# Altium PCB DIOT_Sampler_Adapter.PCBDOC (part 1 of 3)
Units mm, origin at the board's own origin, x right, y up, seen from the top; angles counter-clockwise.
Board outline 37 x 98.9 mm, 4 copper layers (L1, P2, L3, L4), stack 1.6 mm thick; 18 components, 14 nets, 57 pads, 0 vias.
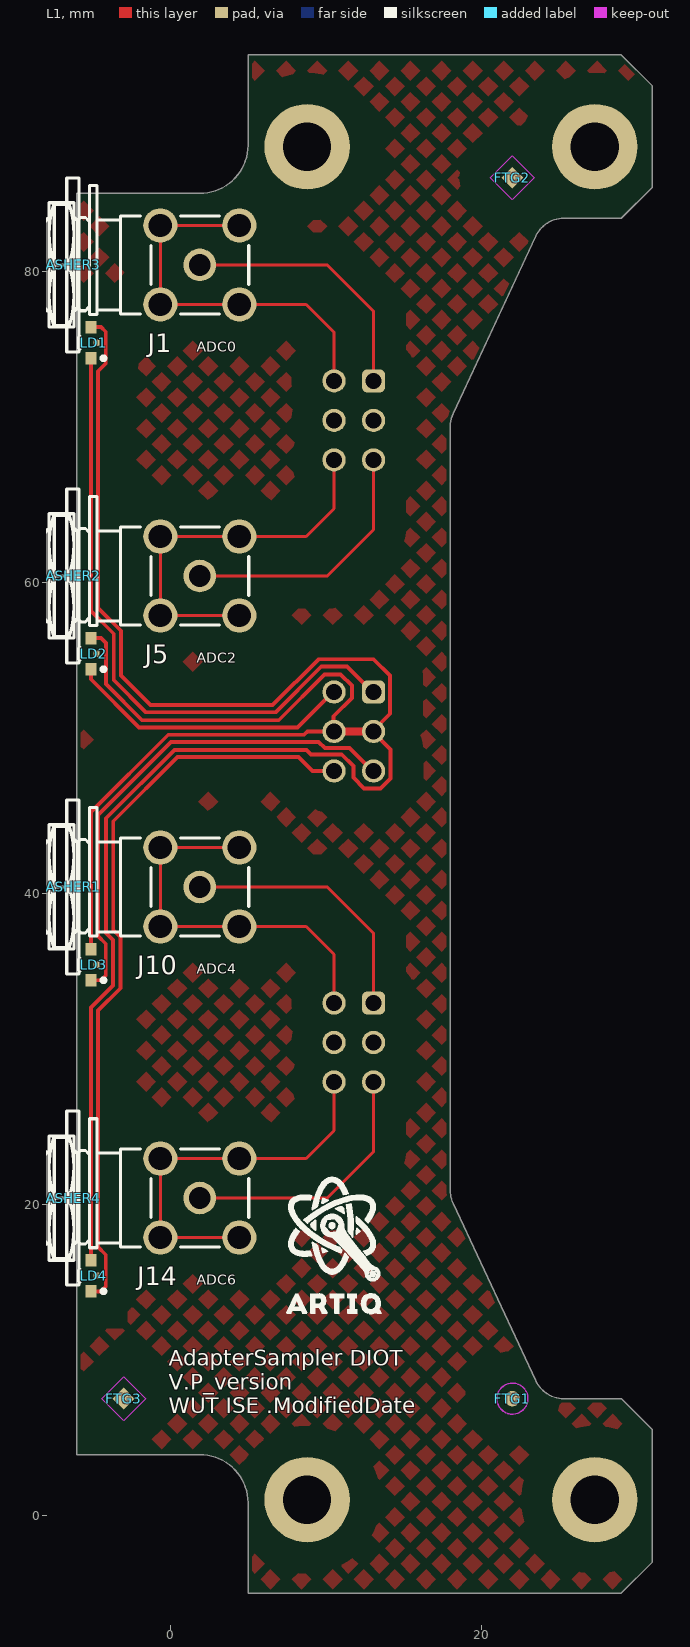
[diagram p0: L1 view]
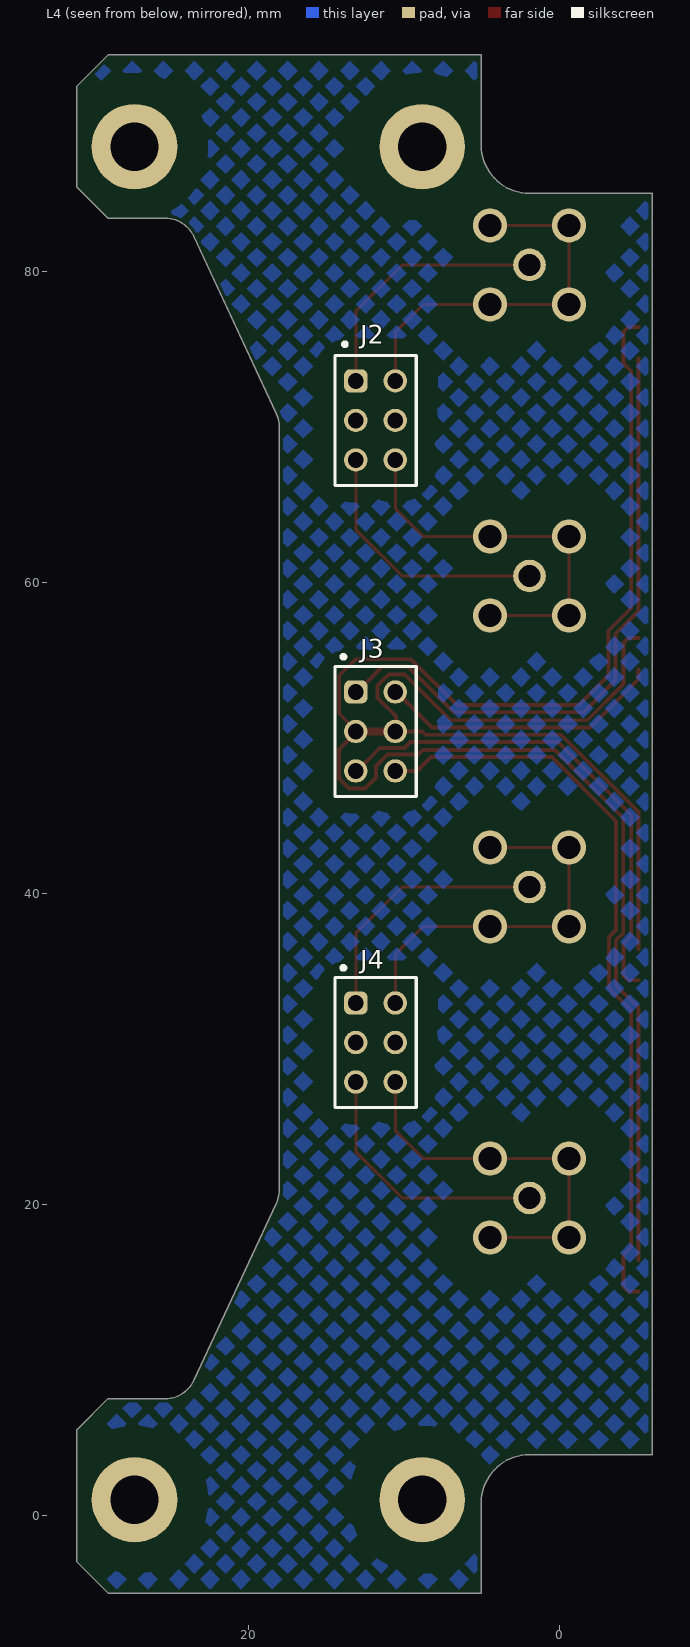
[diagram p1: L4 view, seen from below]
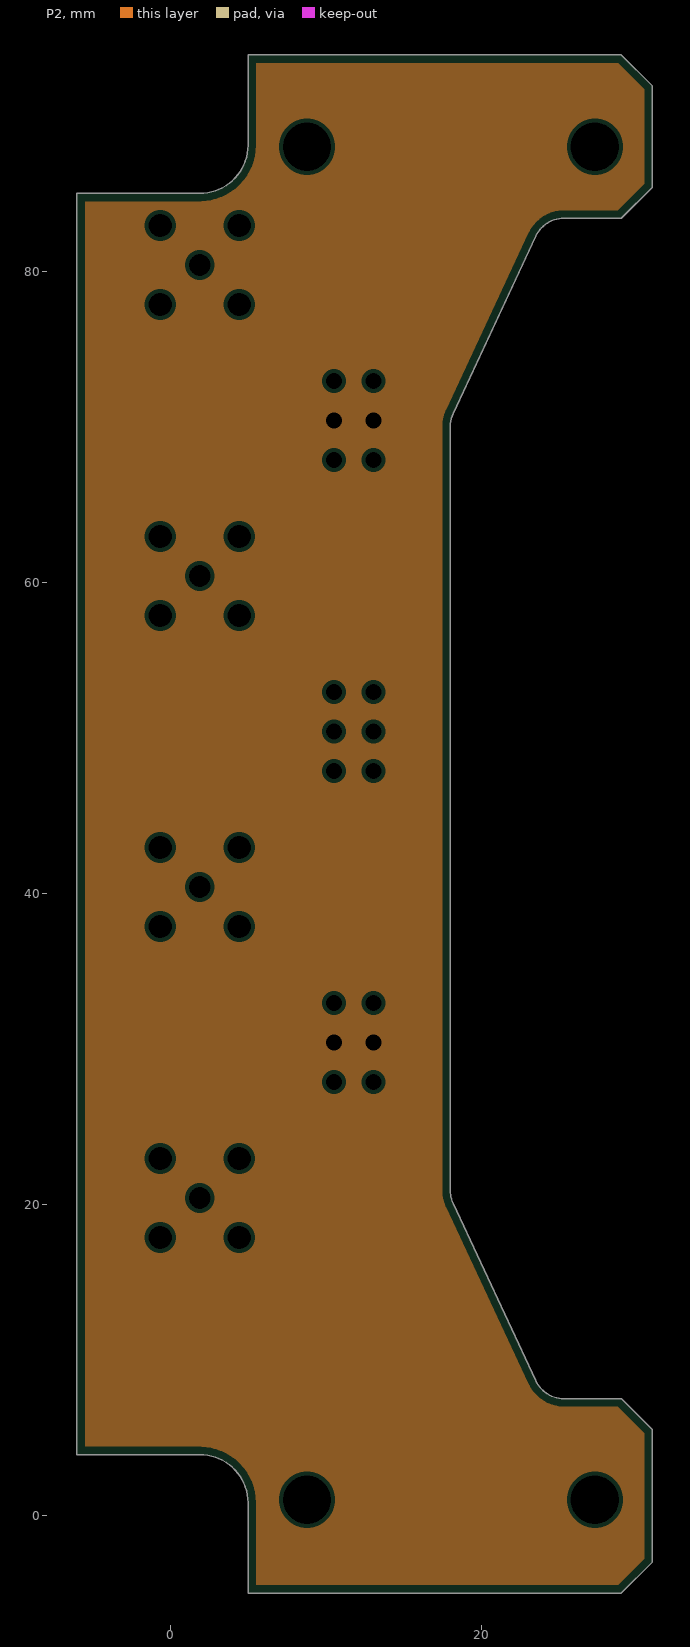
[diagram p2: P2, clearances drawn from the general rule]
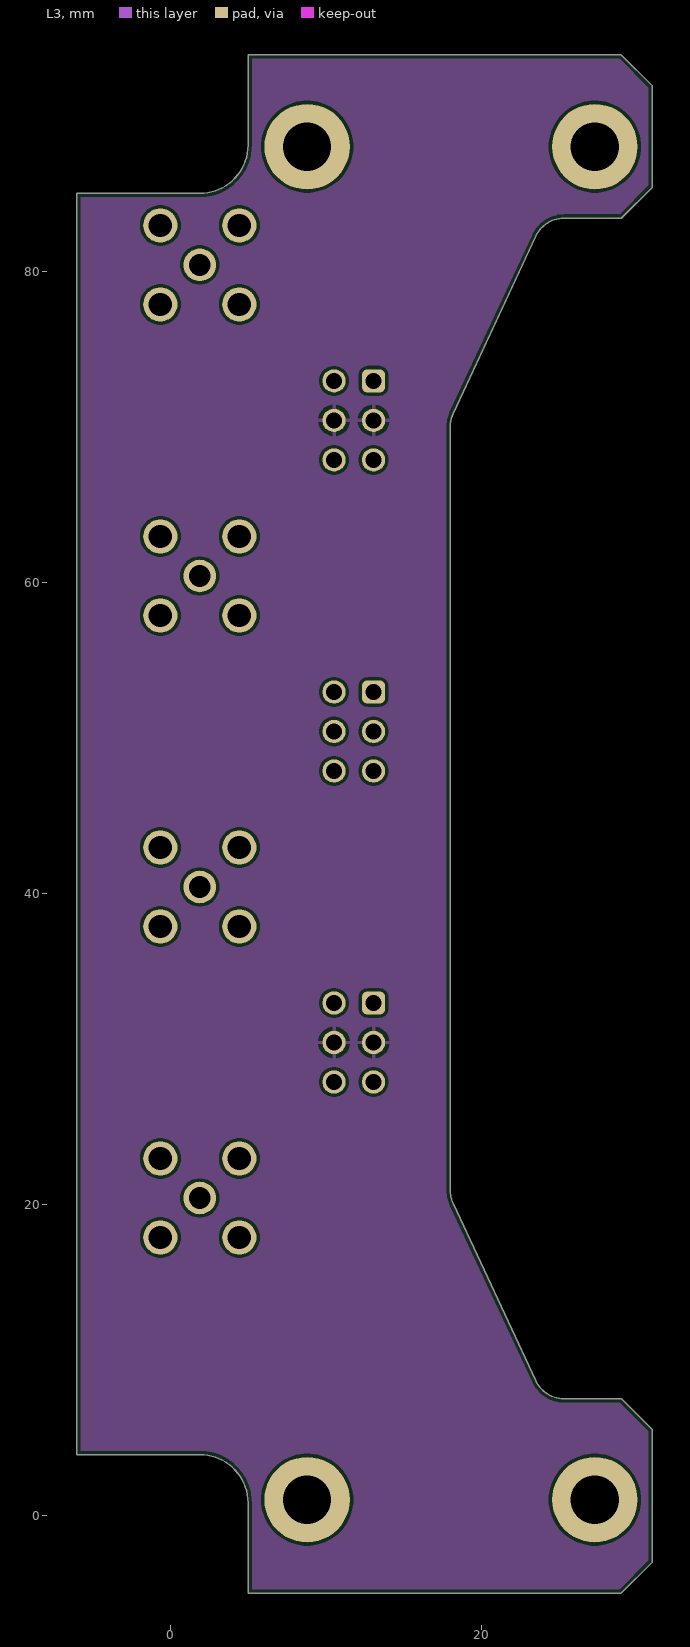
[diagram p3: L3]
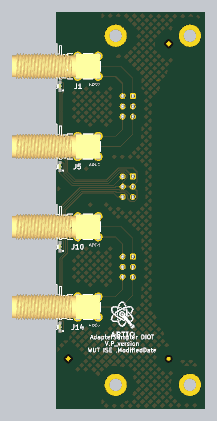
[diagram p5: 3D render of the assembled board from above, using the file's embedded part models]
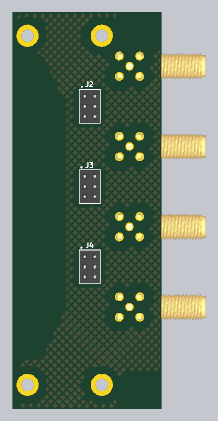
[diagram p6: 3D render of the assembled board from below, using the file's embedded part models]

## Layer stack, top to bottom
TopSolder: solder mask 0.0102, Solder Resist, Dk 3.5
L1: signal copper 0.045
Dielectric1: core 0.12, FR-4, Dk 4.2
P2: plane copper 0.035, net GND
Dielectric 3: prepreg 1.2, Dk 4.2
L3: signal copper 0.035
Dielectric2: core 0.12, FR-4, Dk 4.2
L4: signal copper 0.045
BottomSolder: solder mask 0.0102, Solder Resist, Dk 3.5

## Board outline
5,-5 5,0.8 ccw(c1.9,0.8) 1.9,3.9 -6,3.9 -6,85 1.9,85 ccw(c1.9,88.1) 5,88.1 5,93.9 29,93.9 31,91.9 31,85.4 29,83.4 25.313,83.4 ccw(c25.313,81.4) 23.5,82.245 18.187,70.852 ccw(c20,70.007) 18,70.007 18,20.893 ccw(c20,20.893) 18.187,20.048 23.5,8.655 ccw(c25.313,9.5) 25.313,7.5 29,7.5 31,5.5 31,-3 29,-5

## Design rules (kind name [scope] priority, off if disabled: settings)
AcuteAngle [All] p1: minimum=6.00000000000000E+0001 checktracksonly=FALSE
BoardOutlineClearance [not (OnSilkscreen and HasFootprint('DELOCK_65848'))  and not (OnSilkscreen and HasFootprint('Keystone_7687'))  and not (OnSilkscreen and HasFootprint('LED_AVAGO_HSME-C120'))] p1: gap=0.254 ignorepadtopadclearanceinfootprint=FALSE except(0: Arc-SplitContinuation Track-SplitContinuation SMDPad-SplitContinuation THPad-SplitContinuation Via-SplitContinuation Fill-SplitContinuation Poly-SplitContinuation Region-SplitContinuation Text-SplitContinuation)
Clearance Clearance_Balancing_To_Mechanicals [InPadClass('Mechanical') and (not PadIsPlated) vs InPolygonClass('PolyClass_Balancing')] p1: gap=0.7 ignorepadtopadclearanceinfootprint=FALSE // Clearance constraint used by the balancing polygon generator - between polygon and Mechanical pad class.
Clearance Clearance_Balancing_To_HV [InNetClass('HV') vs InPolygonClass('PolyClass_Balancing')] p2: gap=3 ignorepadtopadclearanceinfootprint=FALSE // Clearance constraint used by the balancing polygon generator - between polygon and HV Class.
Clearance Clearance_Balancing_To_DiffPair [InAnyDifferentialPair vs InPolygonClass('PolyClass_Balancing')] p3: gap=2.5 ignorepadtopadclearanceinfootprint=FALSE // Clearance constraint used by the balancing polygon generator - between polygon and Diff pairs.
Clearance Clearance_Balancing_To_Keepout [((not OnCopper) and isKeepout) vs InPolygonClass('PolyClass_Balancing')] p4: gap=0.127 ignorepadtopadclearanceinfootprint=FALSE // Clearance constraint used by the balancing polygon generator - between polygon and Keepout layer.
Clearance Clearance_Balancing_To_Poly [InPolygon vs InPolygonClass('PolyClass_Balancing')] p5: gap=2 ignorepadtopadclearanceinfootprint=FALSE // Clearance constraint used by the balancing polygon generator - between polygon and polygons.
Clearance Clearance_Balancing_To_Rest [not ((not OnCopper) and isKeepout) vs InPolygonClass('PolyClass_Balancing')] p6: gap=2 ignorepadtopadclearanceinfootprint=FALSE // Clearance constraint used by the balancing polygon generator - between polygon and everything else.
Clearance Clearance_Keepout_MH [IsKeepOut vs HasFootprint('c600h270')  or HasFootprint('PTH-M3.4X6.0_BTKO') or HasFootprint('FIDUCIAL_TOP_S100-200') or HasFootprint('FIDUCIAL_TOP_C100-200')] p7: gap=0 ignorepadtopadclearanceinfootprint=FALSE
Clearance Clearance_Poly [InPoly] p8: gap=0.127 ignorepadtopadclearanceinfootprint=FALSE except(0: Arc-Hole Track-Hole SMDPad-Hole THPad-Hole Via-Hole Fill-Hole Poly-Hole Region-Hole Text-Hole; 0.2: Arc-Poly Track-Poly SMDPad-Poly THPad-Poly Via-Poly Fill-Poly Poly-Poly)
Clearance Clearance_DIFF [(InDifferentialPairClass('All Differential Pairs'))] p9: gap=0.127 ignorepadtopadclearanceinfootprint=FALSE except(0: Arc-Hole Track-Hole SMDPad-Hole THPad-Hole Via-Hole Fill-Hole Poly-Hole Region-Hole Text-Hole; 0.254: Arc-Poly Track-Poly SMDPad-Poly THPad-Poly Via-Poly Fill-Poly Poly-Poly)
Clearance [All] p10: gap=0.127 ignorepadtopadclearanceinfootprint=TRUE except(0: Arc-Hole Track-Hole SMDPad-Hole THPad-Hole Via-Hole Fill-Hole Poly-Hole Region-Hole Text-Hole; 0.203: Track-Poly; 0.381: Arc-Poly SMDPad-Poly THPad-Poly Via-Poly Fill-Poly Poly-Poly)
ComponentClearance ComponentClearance_SMA_Washer [HasFootprint('DELOCK_65848')  or HasFootprint('AMPHENOL_132203-14') or HasFootprint('Keystone_7687') vs HasFootprint('Keystone_7687')] p1: gap=-1 collisioncheckmode=3 verticalgap=-1 showdistances=FALSE
ComponentClearance ComponentClearance_SMA_to_LEDs [HasFootprint('DELOCK_65848')  or HasFootprint('AMPHENOL_132203-14') vs HasFootprint('LED_AVAGO_HSME-C120')] p2: gap=0.254 collisioncheckmode=3 verticalgap=0.254 showdistances=TRUE donotcheckwithout3dbody=TRUE
ComponentClearance [All] p3: gap=0.254 collisioncheckmode=3 verticalgap=0.254 showdistances=TRUE donotcheckwithout3dbody=TRUE
DiffPairsRouting [IsDifferentialPair] p1: maxlimit=0.127 minlimit=0.127 mostfreqgap=0.127 toplayer_minwidth=0.127 toplayer_maxwidth=0.127 toplayer_prefwidth=0.127 bottomlayer_minwidth=0.127 bottomlayer_maxwidth=0.127 bottomlayer_prefwidth=0.127 impedanceprofiledriven=TRUE impedanceprofileid={2AC292A0-4534-4E6F-B50C-52C4BA957C45} impedanceprofilevalue=100.000000 maxuncoupledlength=21
FabricationTestPointUsage TestPointUsage [All] p1: valid=0 allowmultiple=FALSE
FabricationTestpoint Testpoint [All] p1: side=3 testpointundercomponent=TRUE minsize=1.016 maxsize=2.54 preferedsize=1.524 minholesize=0.508 maxholesize=1.016 preferedholesize=0.813 testpointgrid=0.025 allowsidetop=TRUE allowsidebottom=TRUE usegrid=TRUE gridtolerance=0
FanoutControl Fanout_Default [All] p1: bgadir=Out bgaviamode=Centered fanoutstyle=Auto fanoutdirection=Alternating viagrid=0.025 // Fanout_Default (Default Rule)
HoleSize [All] p1: absolutevalues=TRUE maxlimit=3.81 minlimit=0.025 maxpercent=80.000 minpercent=20.000
HoleToHoleClearance [All] p1: gap=0.025 allowstackedmicrovias=TRUE
MinimumSolderMaskSliver [All] p1: minsoldermaskwidth=0
PlaneClearance [All] p1: clearance=0.254
PlaneConnect [All] p1: pad.planeconnectstyle=Relief pad.reliefexpansion=0.508 pad.reliefentries=4 pad.reliefconductorwidth=0.254 pad.reliefairgap=0.254 via.planeconnectstyle=Direct via.reliefexpansion=0.508 via.reliefentries=4 via.reliefconductorwidth=0.254 via.reliefairgap=0.254
PolygonConnect PolygonConnect_PWR [All vs InNetClass('PWR')] p1: thpad.connectstyle=Relief thpad.reliefconductorwidth=0.6 thpad.reliefentries=4 thpad.polygonreliefangle="90 Angle" thpad.airgapwidth=0.254 smdpad.connectstyle=Relief smdpad.reliefconductorwidth=0.4 smdpad.reliefentries=4 smdpad.polygonreliefangle="90 Angle" smdpad.airgapwidth=0.254 via.connectstyle=Direct via.reliefconductorwidth=0.254 via.reliefentries=4 via.polygonreliefangle="90 Angle" via.airgapwidth=0.254
PolygonConnect PolygonConnect_pad [(InPadClass('All Pads'))] p2: connectstyle=Relief reliefconductorwidth=0.254 reliefentries=4 polygonreliefangle="90 Angle" airgapwidth=0.254
PolygonConnect [All] p3: thpad.connectstyle=Relief thpad.reliefconductorwidth=0.254 thpad.reliefentries=4 thpad.polygonreliefangle="90 Angle" thpad.airgapwidth=0.254 smdpad.connectstyle=Relief smdpad.reliefconductorwidth=0.254 smdpad.reliefentries=4 smdpad.polygonreliefangle="90 Angle" smdpad.airgapwidth=0.254 via.connectstyle=Direct via.reliefconductorwidth=0.254 via.reliefentries=4 via.polygonreliefangle="90 Angle" via.airgapwidth=0.254
RoutingVias [All] p1: holewidth=0.2 width=0.5 viastyle="Through Hole" minholewidth=0.2 minwidth=0.5 maxholewidth=0.711 maxwidth=1.27
SilkToSilkClearance [All] p1: silktosilkclearance=0.203
SilkToSolderMaskClearance SilkscreenOverComponentPads [IsPad] p1: minsilkscreentomaskgap=0.127 clearancetoexposedcopper=TRUE
SolderMaskExpansion SolderMaskExpansion_Via [isVia] p1: expansion=0.102 istentingtop=TRUE
SolderMaskExpansion [All] p2: expansion=0.051 istentingtop=FALSE
SupplyNets "Schematic Supply Nets_1" [InNet('GND')] p1: voltage=0.000
SupplyNets "Schematic Supply Nets" [InNet('P3V3')] p2: voltage=0.000
UnRoutedNet [not InPolygonClass('PolyClass_Balancing')] p1: checkbadconnections=TRUE
Width Width_50Ohm [InNetClass('50_Ohms')] p1: maxlimit=0.199 minlimit=0.145 preferedwidth=0.199 toplayer_minwidth=0.199 bottomlayer_minwidth=0.199 impedanceprofiledriven=TRUE impedanceprofileid={3479D118-749D-4991-87F4-7EDB5195C652} impedanceprofilevalue=50.000000 minimp=50.000000 maximp=50.000000 favimp=50.000000
Width [All] p2: maxlimit=2.5 minlimit=0.127 preferedwidth=0.254 minimp=50.000000 maximp=50.000000 favimp=50.000000
13 further rules are at their usual default settings.

## Classes and differential pairs
polygon class PolyClass_Balancing: Balancing_Bot Balancing_Top
net class 50_Ohms: ADC_IN_N0 ADC_IN_N2 ADC_IN_N4 ADC_IN_N6 ADC_IN_P0 ADC_IN_P2 ADC_IN_P4 ADC_IN_P6

## Components (designator, comment, footprint, x,y, rotation, side; value= is the part's Value field where it differs from the comment)
FTG1 "Use only in PCB" FIDUCIAL_TOP_C100-200 22,7.5 r90 top
FTG2 "Use only in PCB" FIDUCIAL_TOP_S100-200 22,86 r90 top
FTG3 "Use only in PCB" FIDUCIAL_TOP_S100-200 -3,7.5 r90 top
J1 "SMA" DELOCK_65848 1.9,80.4 r180 top locked
J2 "61300621821" 61300621821 11.8,70.4 r270 bottom locked
J3 "61300621821" 61300621821 11.8,50.4 r270 bottom locked
J4 "61300621821" 61300621821 11.8,30.4 r270 bottom locked
J5 "SMA" DELOCK_65848 1.9,60.4 r180 top locked
J10 "SMA" DELOCK_65848 1.9,40.4 r180 top locked
J14 "SMA" DELOCK_65848 1.9,20.4 r180 top locked
LD1 "Green" LED_AVAGO_HSME-C120 -5.1,75.4 r90 top
LD2 "Green" LED_AVAGO_HSME-C120 -5.1,55.4 r90 top
LD3 "Green" LED_AVAGO_HSME-C120 -5.1,35.4 r90 top
LD4 "Green" LED_AVAGO_HSME-C120 -5.1,15.4 r90 top
WASHER1 "Custom 3D printed" Keystone_7687 -6.658,40.4 r0 top locked
WASHER2 "Custom 3D printed" Keystone_7687 -6.658,60.4 r0 top locked
WASHER3 "Custom 3D printed" Keystone_7687 -6.658,80.4 r0 top locked
WASHER4 "Custom 3D printed" Keystone_7687 -6.658,20.4 r0 top locked

## Footprints (in the part's own frame and the unit in brackets; to place one, negate y for a bottom-side part, rotate by r counter-clockwise, add the part's x,y. Pads: shape width x height; smd on the part's side, far side on the other; paste and mask are expansions set on the pad)
61300621821 [mm] "Socket Header, Pitch 2.54 mm, THT, Vertical, dual row, 6p"
  rrect50% 1.5x1.5 hole 1.02: 1(-2.54,-1.27)
  round 1.5 hole 1.02: 2(-2.54,1.27) 3(0,-1.27) 4(0,1.27) 5(2.54,-1.27) 6(2.54,1.27)
  silkscreen extent -5.02,-2.62 4.19,2.62, body extent -4.06,-2.54 4.06,2.54, height 8.45
DELOCK_65848 [mm] "50 Ohm Through Hole SMA Right Angle PCB Jack"
  round 2.1 hole 1.4: 1(0,0)
  round 2.2 hole 1.5: 2(-2.54,2.54) 2(-2.54,-2.54) 2(2.54,2.54) 2(2.54,-2.54)
  silkscreen extent -3.15,-5.1 19.1,4, body extent -3,-3.13 19,3.13, height 9.15
FIDUCIAL_TOP_C100-200 [mm] "Round Fiducial Target, Top Layer, 1.0mm, Top Solder 2.0mm, Keepout =2.0mm"
  round 1 smd paste-0.51 mask+0.5: FTG2(0,0)
  L1 keep-out circle w0.1: c0,0 r1
FIDUCIAL_TOP_S100-200 [mm] "Square Fiducial Target, Top Layer, 1.0mm, Top Solder 2.0mm, Keepout =2.0mm"
  rect 1x1 smd rot 45 paste-0.51 mask+0.5: 1(0,0)
  L1 keep-out region: 1.414,0 0,-1.414 -1.414,0 0,1.414
Keystone_7687 [mm] "Polyphenylene Sulfide PPS Shoulder Washer"
  silkscreen extent -0.8,-5.6 0.8,5.6
LED_AVAGO_HSME-C120 [mm] "Green Chip LED, 2-Leads, Body 1.7x1.1mm, Side Emitting Package"
  rect 0.8x0.7 smd: 1(-1,0) 2(1,0)
  rect 0.4x0.4 smd: 3(0,-0.35)
  silkscreen extent -1.12,-0.92 0.42,0.8, body extent -0.85,-0.3 0.85,0.8, height 0.7

## Part data
FTG1: library part FIDUCIAL_TARGET_C100-200, "Fiducial Target", Author="CERN DEM JLC", Component Type="Standard (No BOM)", ComponentHeight=0mm, CreateDate=09.02.2010, Family=Fiducial, HelpURL=Undefined, LatestRevisionDate=04.04.2012, Mounted=No, PackageDescription="Round Fiducial Target, Top Layer, 1.0mm, Top Solder 2.0mm, Keepout =2.0mm", Part Description="Round Fiducial Target, Top Layer, 1.0mm, Top Solder 2.0mm, Keepout =2.0mm", Part Number=FIDUCIAL_TARGET_C100-200, Pin Count=1, Sense=No, SMD=Yes, Socket=No, Status=None
FTG2 FTG3: library part FIDUCIAL_TARGET_S100-200, "Fiducial Target", Author="CERN DEM JLC", Component Type="Standard (No BOM)", ComponentHeight=0mm, CreateDate=09.02.2010, Family=Fiducial, HelpURL=Undefined, LatestRevisionDate=04.04.2012, Mounted=No, PackageDescription="Square Fiducial Target, Top Layer, 1.0mm, Top Solder 2.0mm, Keepout =2.0mm", Part Description="Square Fiducial Target, Top Layer, 1.0mm, Top Solder 2.0mm, Keepout =2.0mm", Part Number=FIDUCIAL_TARGET_S100-200, Pin Count=1, Sense=No, SMD=Yes, Socket=No, Status=None
J1 J5 J10 J14: library part DELOCK_65848, "50 Ohm Through Hole SMA Right Angle PCB Jack", Manufacturer=DELOCK, Manufacturer Part Number="5848 (4043619658480)", Author=GK, Component Type=Standard, ComponentHeight=12.5, CreateDate=13.05.2019, Family=SMA, HelpURL=\\cern.ch\dfs\Applications\Altium\Datasheets\AMPHENOL_132203-16.pdf, LatestRevisionDate=13.05.2019, Mounted=Yes, Part Description="50 Ohm Through Hole SMA Right Angle PCB Jack", Part Number=DELOCK_65848, Pin Count=5, PressFit=No, Sense=No, SMD=No, Socket=No, Status=None
J2 J3 J4: "WR-PHD Socket Header, THT, Vertical, pitch 2.54mm, 2 Row, 6P", Contact Resistance=20mOhm, Manufacturer="Wurth Elektronik", Operating Temperature Max=125°C, Operating Temperature Min=-40°C, Rated Current=3A, Withstanding Voltage=500V, Working Voltage=250V, Category="Board-to-Board Connectors", ComponentLink1Description="Website Link", ComponentLink1URL=https://www.we-online.com/redexpert/article/61300621821?ad, ComponentLink2Description="Datasheet Link", ComponentLink2URL=https://www.we-online.com/redexpert/spec/61300621821?ad, Gender="Socket Header", Manufacturer Part Number=61300621821, Match Code=WR-PHD, Mount="Through Hole", Number of Pins=6, Number of Rows=2, Orientation=Vertical, Packaging=Tray, Pitch=2.54mm
LD1 LD2 LD3 LD4: library part LED_AVAGO_HSME-C120, "LED Green 1C 2A", Manufacturer="AVAGO TECHNOLOGIES", Manufacturer Part Number=HSME-C120, Author="CERN DEM JMW", Bonding=No, Color=Green, Component Type=Standard, ComponentHeight=0.7mm, ComponentLink1Description="Design Guide", ComponentLink1URL=\\cern.ch\dfs\Applications\Altium\Datasheets\LED_AVAGO_HSME-C110_DESIGN-GUIDE.pdf, CreateDate=22/07/2009, HelpURL=\\cern.ch\dfs\Applications\Altium\Datasheets\LED_AVAGO_HSME-C120.pdf, LatestRevisionDate=20/06/2012, Mounted=Yes, PackageDescription="Green Chip LED, 2-Leads, Body 1.7x1.1mm, Side Emitting Package", Part Description="High Performance Right Angle Chip Green LED", Part Number=LED_AVAGO_HSME-C120, Pin Count=2, PressFit=No, Sense=No, SMD=Yes, Socket=No
WASHER1 WASHER2 WASHER3 WASHER4: library part Keystone_7687, "SMA_Shoulder Washer", Author=GK, Component Type=Mechanical, ComponentHeight=1.91mm, CreateDate=28.01.2016, HelpURL=\\cern.ch\dfs\Applications\Altium\Datasheets\AAVID-THERMALLOY_7721-7PPSG.pdf, LatestRevisionDate=28.01.2016, Manufacturer="Custom 3D printed", Manufacturer Part Number="Custom 3D printed", Mounted=Yes, PackageDescription="Polyphenylene Sulfide PPS Shoulder Washer", Part Description="Polyphenylene Sulfide PPS Shoulder Washer", Part Number="Custom 3D printed", Pin Count=0, PressFit=No, Sense=No, SMD=No, Socket=No, Status=None

## Free pads (board coordinates)
  round 5.5 hole 3.1: MH(8.8,1) MH(8.8,88) MH(27.3,1) MH(27.3,88)

## Nets (pads, with @x,y where several pads share a name; then routed paths per layer and width w, separated by ;. In a path a pad name is that pad's centre, name@x,y a point inside that pad or via, vN(x,y) a via of type N, cw(c..) or ccw(c..) an arc to the next point about the centre after c; other vN are vias at no path point)
ADC_IN_N0: J1.2 J2.2 | length 25.2
  L1 w0.199: J1.2@4.44,82.94 J1.2@-0.64,82.94 J1.2@-0.64,77.86 J1.2@4.44,77.86 8.74,77.86 10.53,76.07 J2.2@10.53,72.94
ADC_IN_N2: J2.6 J5.2 | length 25.2
  L1 w0.199: J5.2@4.44,57.86 J5.2@-0.64,57.86 J5.2@-0.64,62.94 J5.2@4.44,62.94 8.74,62.94 10.53,64.73 J2.6@10.53,67.86
ADC_IN_N4: J4.2 J10.2 | length 25.2
  L1 w0.199: J10.2@4.44,42.94 J10.2@-0.64,42.94 J10.2@-0.64,37.86 J10.2@4.44,37.86 8.74,37.86 10.53,36.07 J4.2@10.53,32.94
ADC_IN_N6: J4.6 J14.2 | length 25.2
  L1 w0.199: J14.2@4.44,17.86 J14.2@-0.64,17.86 J14.2@-0.64,22.94 J14.2@4.44,22.94 8.74,22.94 10.53,24.73 J4.6@10.53,27.86
ADC_IN_P0: J1.1 J2.1 | length 16.9
  L1 w0.199: J1.1@1.9,80.4 10.095,80.4 13.07,77.425 J2.1@13.07,72.94
ADC_IN_P2: J2.5 J5.1 | length 16.9
  L1 w0.199: J5.1@1.9,60.4 10.095,60.4 13.07,63.375 J2.5@13.07,67.86
ADC_IN_P4: J4.1 J10.1 | length 16.9
  L1 w0.199: J10.1@1.9,40.4 10.095,40.4 13.07,37.425 J4.1@13.07,32.94
ADC_IN_P6: J4.5 J14.1 | length 16.9
  L1 w0.199: J14.1@1.9,20.4 10.095,20.4 13.07,23.375 J4.5@13.07,27.86
GND: J2.3 J2.4 J4.3 J4.4
P3V3: J3.3 J3.4 LD1.2 LD2.2 LD3.2 LD4.2 | length 156.9
  L1 w0.25: LD4.2@-5.1,16.4 -5.1,32.648 -3.671,34.077 -3.671,36.989 -4.13,37.449 -4.13,44.821 0.268,49.219 8.768,49.219 9.059,48.928 11.029,48.928 11.775,48.182 11.775,47.43 12.468,46.737 13.507,46.737 14.153,47.383 14.153,49.247 13,50.4 14.138,51.538 14.138,53.987 13.085,55.04 9.52,55.04 6.573,52.093 -1.277,52.093 -3.172,53.987 -3.172,56.875 -4.64,58.342 -4.64,73.56 -4.15,74.05 -4.15,76.1 -4.45,76.4 LD1.2@-5.1,76.4 ; LD3.2@-5.1,36.4 -5.1,45.222 -0.134,50.189 8.603,50.189 8.814,50.4 10.46,50.4 10.489,50.429 10.489,51.379 11.675,52.564 11.675,53.35 10.955,54.07 9.922,54.07 6.974,51.123 -1.813,51.123 -4.142,53.451 -4.142,56.092 -4.45,56.4 LD2.2@-5.1,56.4
  L1 w0.5: J3.4@10.46,50.4 J3.3@13,50.4
TS0: J3.1 LD1.1 | length 40.7
  L1 w0.25: LD1.1@-5.1,74.4 -5.1,58.152 -3.632,56.684 -3.632,53.701 -1.564,51.632 6.763,51.632 9.711,54.58 11.36,54.58 J3.1@13,52.94
TS2: J3.2 LD2.1 | length 18.4
  L1 w0.25: LD2.1@-5.1,54.4 -5.1,53.759 -2.004,50.663 8.183,50.663 J3.2@10.46,52.94
TS4: J3.5 LD3.1 | length 32
  L1 w0.25: LD3.1@-5.1,34.4 -4.45,34.4 -4.15,34.7 -4.15,36.75 -4.64,37.24 -4.64,45.032 0.057,49.728 9.543,49.728 9.944,49.328 11.532,49.328 J3.5@13,47.86
TS6: J3.6 LD4.1 | length 48.2
  L1 w0.25: LD4.1@-5.1,14.4 -4.45,14.4 -4.15,14.7 -4.15,16.75 -4.64,17.24 -4.64,32.458 -3.21,33.887 -3.21,37.18 -3.67,37.639 -3.67,44.63 0.459,48.759 8.243,48.759 9.142,47.86 J3.6@10.46,47.86
pads on no net: FTG1.FTG2 FTG2.1 FTG3.1 LD1.3 LD2.3 LD3.3 LD4.3

## Polygon pours and split planes (outlines as drawn)
no net on L4 "Balancing_Bot" (solid, pour order 35): 5,-5 5,0.8 ccw(c1.9,0.8) 1.9,3.9 -6,3.9 -6,85 1.9,85 ccw(c1.9,88.1) 5,88.1 5,93.9 29,93.9 31,91.9 31,85.4 29,83.4 25.313,83.4 ccw(c25.313,81.4) 23.5,82.245 18.187,70.852 ccw(c20,70.007) 18,70.007 18,20.893 ccw(c20,20.893) 18.187,20.048 23.5,8.655 ccw(c25.313,9.5) 25.313,7.5 29,7.5 31,5.5 31,-3 29,-5
GND on L3 "GND_L03_P034" (solid, remove dead copper, pour order 34): 5,-5 5,0.8 ccw(c1.9,0.8) 1.9,3.9 -6,3.9 -6,85 1.9,85 ccw(c1.9,88.1) 5,88.1 5,93.9 29,93.9 31,91.9 31,85.4 29,83.4 25.313,83.4 ccw(c25.313,81.4) 23.5,82.245 18.187,70.852 ccw(c20,70.007) 18,70.007 18,20.893 ccw(c20,20.893) 18.187,20.048 23.5,8.655 ccw(c25.313,9.5) 25.313,7.5 29,7.5 31,5.5 31,-3 29,-5
no net on L1 "Balancing_Top" (solid, pour order 36): 5,-5 5,0.8 ccw(c1.9,0.8) 1.9,3.9 -6,3.9 -6,85 1.9,85 ccw(c1.9,88.1) 5,88.1 5,93.9 29,93.9 31,91.9 31,85.4 29,83.4 25.313,83.4 ccw(c25.313,81.4) 23.5,82.245 18.187,70.852 ccw(c20,70.007) 18,70.007 18,20.893 ccw(c20,20.893) 18.187,20.048 23.5,8.655 ccw(c25.313,9.5) 25.313,7.5 29,7.5 31,5.5 31,-3 29,-5
GND on P2 (split plane): 30.49,91.689 30.49,85.611 28.789,83.91 25.313,83.91 25.312,83.91 25.094,83.901 24.877,83.872 24.663,83.825 24.454,83.759 24.252,83.675 24.058,83.574 23.873,83.456 23.699,83.323 23.538,83.175 23.39,83.014 23.256,82.84 23.139,82.655 23.038,82.462 23.038,82.461 17.725,71.068 17.724,71.066 17.641,70.865 17.575,70.656 17.528,70.443 17.499,70.225 17.49,70.008 17.49,70.007 17.49,20.893 17.49,20.892 17.499,20.675 17.528,20.457 17.575,20.244 17.641,20.035 17.724,19.834 17.725,19.832 23.038,8.439 23.038,8.438 23.139,8.245 23.256,8.06 23.39,7.886 23.538,7.725 23.699,7.577 23.873,7.444 24.058,7.326 24.252,7.225 24.454,7.141 24.663,7.075 24.877,7.028 25.094,6.999 25.312,6.99 25.313,6.99 28.789,6.99 30.49,5.289 30.49,-2.789 28.789,-4.49 5.51,-4.49 5.51,0.8 5.51,0.803 5.501,1.058 5.474,1.314 5.428,1.567 5.364,1.817 5.283,2.062 5.184,2.3 5.069,2.53 4.937,2.752 4.79,2.964 4.628,3.164 4.453,3.353 4.264,3.528 4.064,3.69 3.852,3.837 3.63,3.969 3.4,4.084 3.162,4.183 2.917,4.264 2.667,4.328 2.414,4.374 2.158,4.401 1.903,4.41 1.9,4.41 -5.49,4.41 -5.49,84.49 1.9,84.49 1.903,84.49 2.158,84.499 2.414,84.526 2.667,84.572 2.917,84.636 3.162,84.717 3.4,84.816 3.63,84.931 3.852,85.063 4.064,85.21 4.264,85.372 4.453,85.547 4.628,85.736 4.79,85.936 4.937,86.148 5.069,86.37 5.184,86.6 5.283,86.838 5.364,87.083 5.428,87.333 5.474,87.586 5.501,87.842 5.51,88.097 5.51,88.1 5.51,93.39 28.789,93.39

## Keep-outs
KeepOutLayer:
  circle w0.25: c8.8,201 r1.414
  circle w0.25: c27.3,201 r1.414
  circle w0.25: c27.3,288 r1.414
  circle w0.25: c8.8,288 r1.414